# Altium PCB ASCII-v1.2.PcbDoc (part 3 of 4)
Units mil, origin at the board's own origin, x right, y up, seen from the top; angles counter-clockwise.
Board outline 1968.5 x 4921.26 mil, 4 copper layers (Top Layer, Layer 1, Layer 2, Bottom Layer), stack 62.45 mil thick; 189 components, 115 nets, 824 pads, 260 vias.
Unrouted connection lines stored in the file: 139.
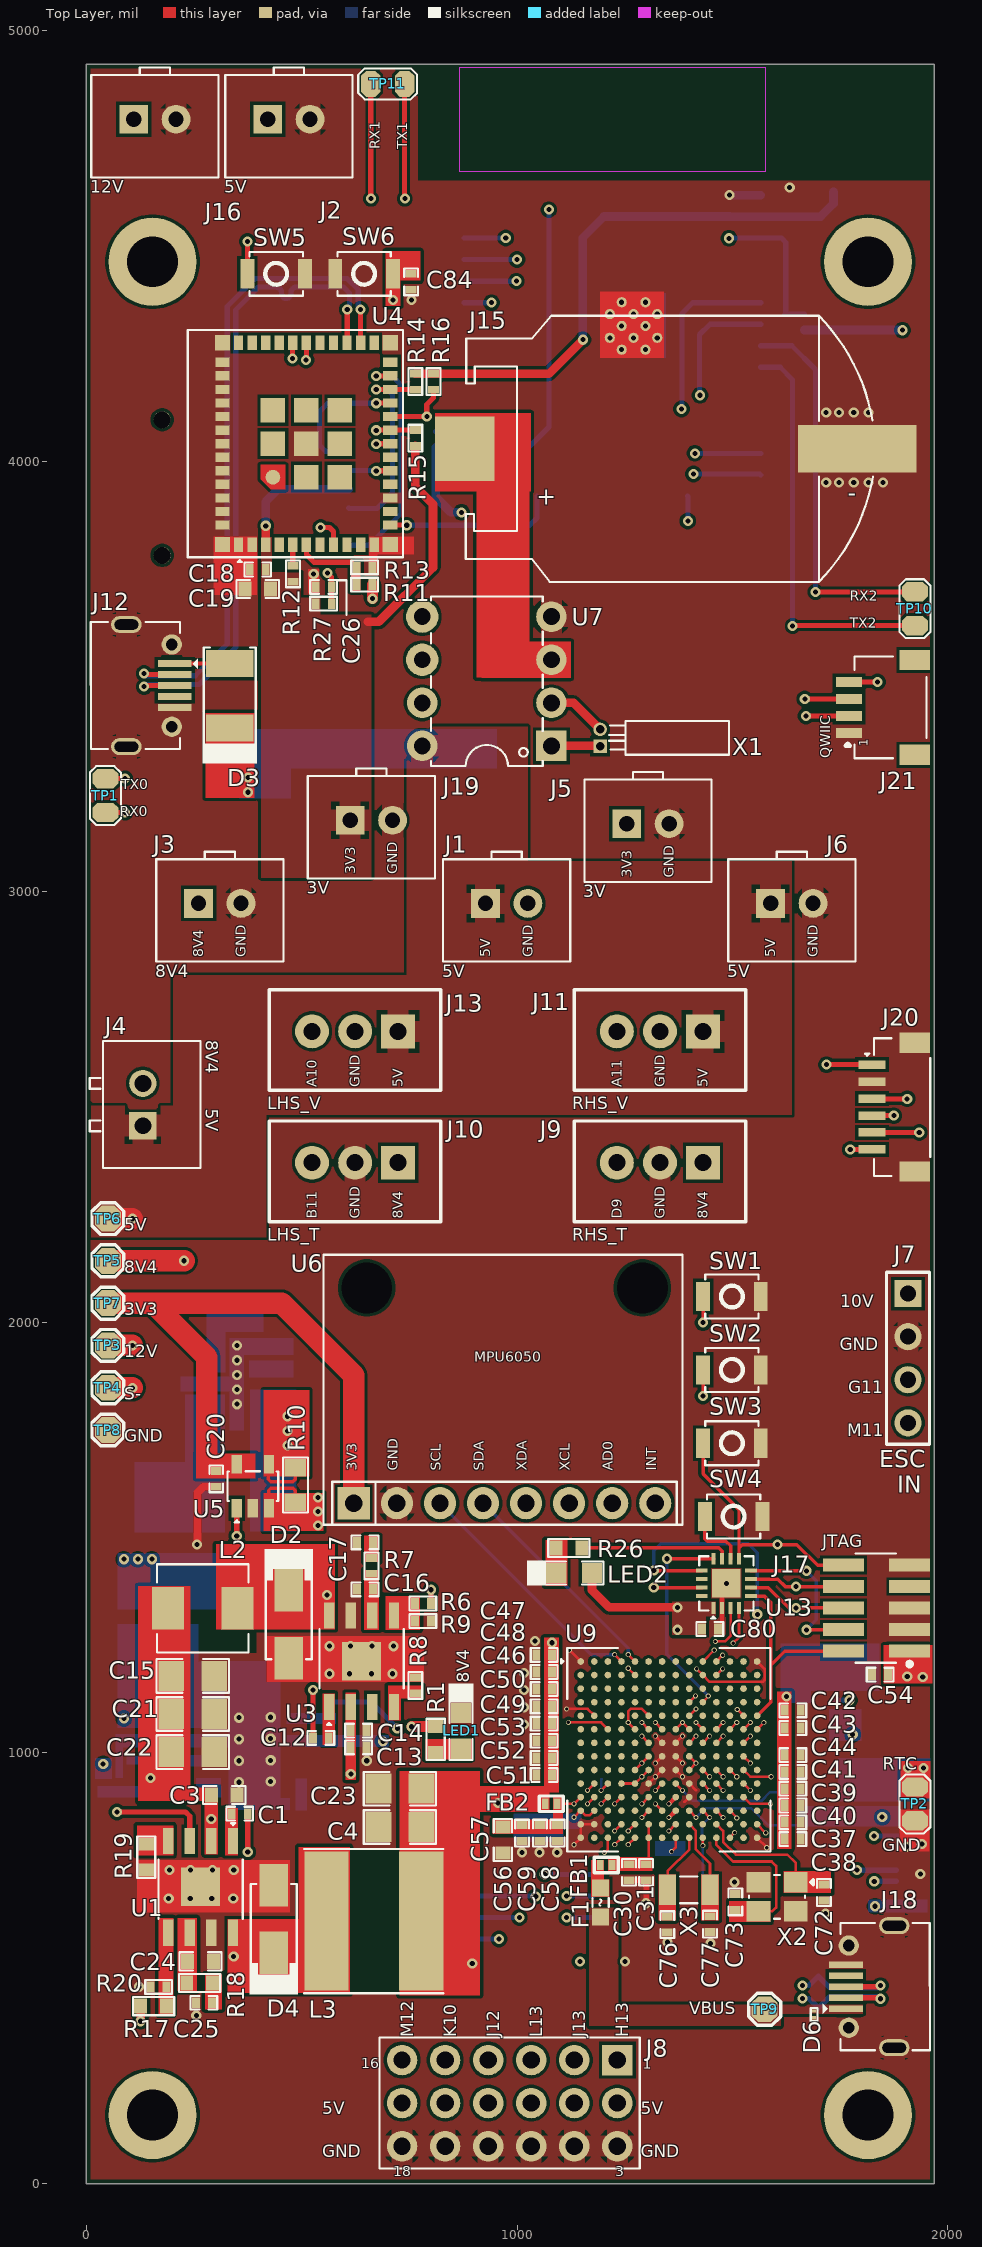
[diagram p0: Top Layer view]

## Part data (continued)
U12: "IC EEPROM 64KBIT I2C 1MHZ 8TSSOP", LCSC Part Number=C222148, Manufacturer=STMicroelectronics, Package=TSSOP-8, Supplier Part Number=497-15760-2-ND, Category=EEPROM, ComponentLink1Description=LCSC, ComponentLink1URL=https://www.lcsc.com/product-detail/EEPROM_STMicroelectronics-M24C64-FDW6TP_C222148.html, ComponentLink2Description=https://datasheet.ciiva.com/26942/getdatasheetpartid-785735-26942181.pdf?src-supplier=Verical, ComponentLink2URL=https://datasheet.ciiva.com/26942/getdatasheetpartid-785735-26942181.pdf?src-supplier=Verical, ComponentLink3Description=https://datasheet.ciiva.com/6617/cd00259166-6617416.pdf?src-supplier=Digikey, ComponentLink3URL=https://datasheet.ciiva.com/6617/cd00259166-6617416.pdf?src-supplier=Digikey, Item Type=IC, Manufacturer Part Number=M24C64-FDW6TP, Pricing="4000=0.23401, 8000=0.22895, 12000=0.22493, 28000=0.21957 (USD)", RoHS=Yes, Stock=12000, Supplier=Digikey
U13: "IC MCU 32BIT 32KB FLASH 16QFN", Manufacturer="NXP USA", Supplier Part Number=49X9712, Manufacturer Part Number=MKL02Z32VFG4, RoHS=No, Supplier=Newark
U14: "RX TXRX MOD WIFI TRACE ANT SMD", Manufacturer="Espressif Systems", Supplier Part Number 1=1965-ESP32-WROOM-32E(4MB)CT-ND, Manufacturer Part Number=ESP32-WROOM-32E-N4, Pricing 1="1=3.00000 (USD)", RoHS=No, Supplier 1=Digi-Key
X1: library part "DT-26 32.768KHz", "DT-26 Crystals ROHS", LCSC Part Number=C93229, Manufacturer="KDS Daishinku", Package=DT-26, ComponentLink1Description=LCSC, ComponentLink1URL=https://www.lcsc.com/product-detail/Crystals_KDS-Daishinku-DT-26-32-768KHz_C93229.html, Item Type=Crystal, Manufacturer Part Number="DT-26 32.768KHz"
X2: library part X322524MOB4SI, "24MHz SMD Crystal Resonator 12pF ±10ppm ±30ppm -40℃~+85℃ SMD3225-4P Crystals ROHS", LCSC Part Number=C70590, Manufacturer="Yangxing Tech", ComponentLink1Description=LCSC, ComponentLink1URL=https://www.lcsc.com/product-detail/Crystals_Yangxing-Tech-X322524MOB4SI_C70590.html, Item Type=Crystal, Manufacturer Part Number=X322524MOB4SI
X3: library part NX3215SA-32.768K-STD-MUA-8, "CRYSTAL 32.7680KHZ 12.5PF SMD", Case/Package=SMD/SMT, ESR (Equivalent Series Resistance)=70kR, Frequency=32.768kHz, Frequency Tolerance=20ppm, LCSC Part Number=C156245, Load Capacitance=12.5pF, Manufacturer=NDK, Max Operating Temperature=85°C, Min Operating Temperature=-40°C, Package Quantity=1000, Supplier Part Number 1=644-1156-6-ND, ComponentLink1Description=https://media.digikey.com/pdf/Data%20Sheets/NDK%20PDFs/NX3215SA-32.768K-STD-MUA-8.pdf?src-supplier=Digi-Key, ComponentLink1URL=https://media.digikey.com/pdf/Data%20Sheets/NDK%20PDFs/NX3215SA-32.768K-STD-MUA-8.pdf?src-supplier=Digi-Key, ComponentLink2Description=http://www.ndk.com/images/products/catalog/c_NX3215SA-STD-MUA-14_e.pdf?src-supplier=Digi-Key, ComponentLink2URL=http://www.ndk.com/images/products/catalog/c_NX3215SA-STD-MUA-14_e.pdf?src-supplier=Digi-Key, Height=0.035inch, Lead Free="Lead Free", Length=0.126inch, Manufacturer Part Number=NX3215SA-32.768K-STD-MUA-8, Mount="Surface Mount", Number of Pins=2, Packaging="Tape and Reel", Pricing 1="1=0.68, 10=0.602, 50=0.5628, 100=0.4974, 500=0.47124, 1000=0.3927 (USD)", Stock 1=29951, Supplier 1=Digi-Key, Width=0.059inch

## Free pads (board coordinates)
  round 204.72 hole 118.11: MH(153.52,4462.89) MH(153.52,159) MH(1814.98,4462.89) MH(1814.98,159)

## Via types
v1: diameter 23.62, hole 11.81, Top Layer to Bottom Layer, tented both sides, 169 vias
v2: diameter 11.81, hole 7.87, Top Layer to Bottom Layer, tented both sides, 78 vias
v3: diameter 23.62, hole 11.81, Top Layer to Bottom Layer, 13 vias